# Altium PCB NB3000XN.PcbDoc (part 26 of 71)
Units mil, origin at the board's own origin, x right, y up, seen from the top; angles counter-clockwise.
Board outline 9527.56 x 6929.77 mil, 6 copper layers (Top Layer, GND+SHIELD, MidLayer1, MidLayer2, P2 - 3V3+5V0, Bottom Layer), stack 62.375 mil thick; 832 components, 1027 nets, 4655 pads, 4981 vias.
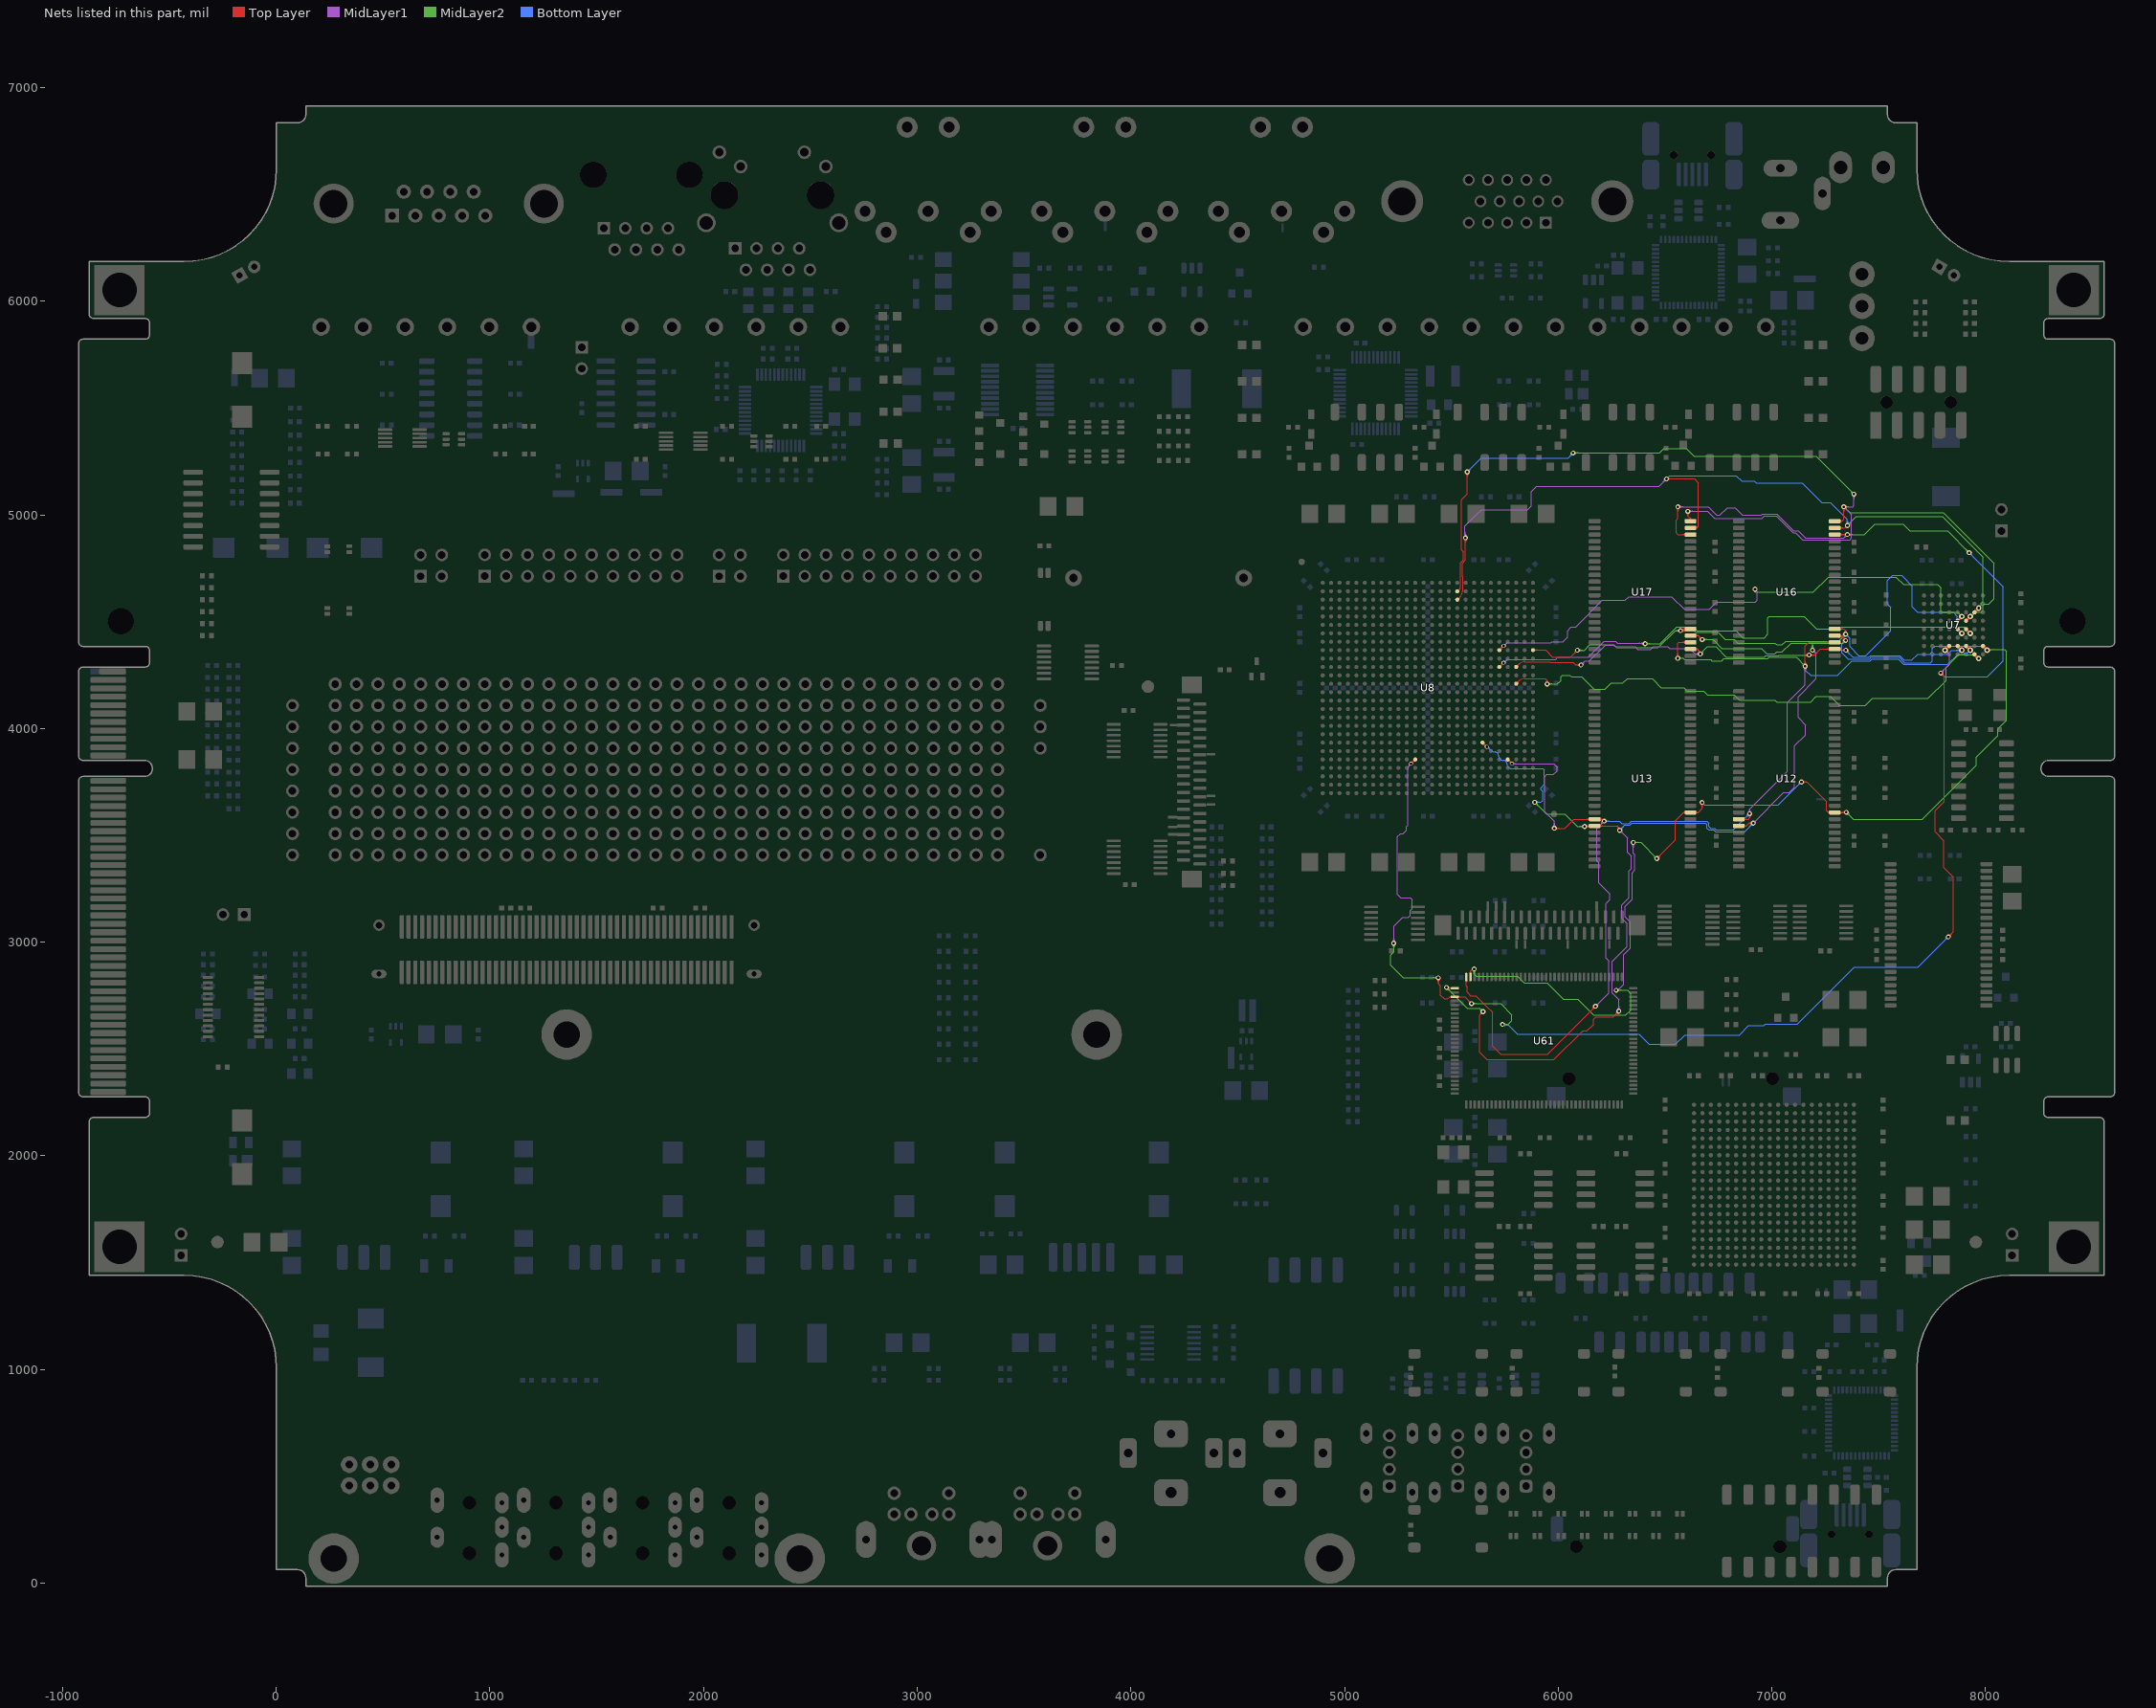
[diagram p30: the nets of this part, all layers, seen from the top]

## Via types
v1: diameter 23, hole 11.81, Top Layer to Bottom Layer, 3672 vias
v2: diameter 26, hole 11.81, Top Layer to Bottom Layer, 461 vias
v3: diameter 19, hole 11.81, Top Layer to Bottom Layer, tented both sides, 396 vias
v4: diameter 23.62, hole 11.81, Top Layer to Bottom Layer, 288 vias
v5: diameter 20, hole 11.81, Top Layer to Bottom Layer, 91 vias
v6: diameter 23, hole 11.81, Top Layer to Bottom Layer, tented both sides, 50 vias
v7: diameter 31, hole 11.81, Top Layer to Bottom Layer, 15 vias
v8: diameter 27.56, hole 11.81, Top Layer to Bottom Layer, tented both sides, 4 vias
v9: diameter 29, hole 11.81, Top Layer to Bottom Layer, 3 vias
v10: diameter 21, hole 11.81, Top Layer to Bottom Layer, 1 vias

## Nets (pads, with @x,y where several pads share a name; then routed paths per layer and width w, separated by ;. In a path a pad name is that pad's centre, name@x,y a point inside that pad or via, vN(x,y) a via of type N, cw(c..) or ccw(c..) an arc to the next point about the centre after c; other vN are vias at no path point) (continued)
DB_MEM.BUS_A14: U7.A7 U8.L24 U12.36 U13.36 U16.25 U17.25 U61.101 | length 8477.1
  Top Layer w4: U61.101@5586.86,2853.36 ccw(c5580.03,2860.19) 5589.69,2860.19 ccw(c5599.34,2860.19) U61.101@5592.51,2853.36 ; U61.101@5589.68,2837.34 5589.69,2866.2 5598.52,2875.04 v1(5606.86,2875.04) ; 5589.98,2866.5 cw(c5600.15,2856.33) v1@5605,2869.86 ; 5594.44,2870.96 cw(c5602.5,2862.9) v1@5606.35,2873.63 ; U8.L24@5803.39,4295.77 ccw(c5803.39,4313.49) 5815.92,4300.96 ; U8.L24@5810.73,4288.43 cw(c5828.45,4288.43) 5815.92,4300.96 ; 5924.74,4312.29 5920,4312.29 ; v1@6100.14,4290.99 ccw(c6083.92,4274.77) 6083.92,4297.71 ccw(c6083.92,4320.64) v1@6100.14,4304.43 ; v1@6102.97,4293.82 ccw(c6093.58,4284.43) 6093.58,4297.71 ccw(c6093.58,4310.99) v1@6102.97,4301.6 ; v1(6106.86,4297.71) 6081.16,4297.71 6070,4308.87 5965.11,4308.87 5961.69,4312.29 5920,4312.29 ; v1(6461.86,3391.71) 6548.52,3478.37 6548.52,3568.52 6587.52,3607.52 ; v1@6461.86,3397.21 ccw(c6461.86,3410.49) 6471.25,3401.1 ccw(c6480.64,3391.71) v1@6467.36,3391.71 ; v1@6461.86,3401.21 ccw(c6461.86,3424.14) 6478.07,3407.93 ccw(c6494.29,3391.71) v1@6471.36,3391.71 ; U13.36@6595.04,3603.32 ccw(c6587.52,3598.69) 6587.52,3607.52 ; U13.36@6595.04,3611.72 cw(c6587.52,3616.35) 6587.52,3607.52 ; U17.25@6619.41,4372.28 6650.95,4372.28 ; U13.36@6642.91,3602.16 cw(c6654.97,3591.27) 6654.97,3607.52 ; U13.36@6642.91,3612.88 ccw(c6654.97,3623.77) 6654.97,3607.52 ; U17.25@6643.87,4368.23 cw(c6650.95,4364.07) 6650.95,4372.28 ; U17.25@6643.87,4376.34 ccw(c6650.95,4380.5) 6650.95,4372.28 ; 6652.31,4370.92 cw(c6634,4352.61) v1@6659.73,4349.67 ; 6658.17,4365.06 cw(c6644.52,4351.41) v1@6663.7,4349.21 ; v1(6665.19,4349.04) 6665.19,4358.04 6650.95,4372.28 ; v1@6666.81,3647.66 cw(c6650.59,3631.44) 6673.52,3631.44 cw(c6696.46,3631.44) v1@6680.24,3647.66 ; v1@6669.64,3650.49 cw(c6660.25,3641.1) 6673.52,3641.1 cw(c6686.8,3641.1) v1@6677.41,3650.49 ; v1(6673.52,3654.37) 6673.52,3626.07 6654.97,3607.52 ; v1(7138.52,3750.04) 7165.19,3750.04 7256.86,3658.37 7256.86,3615.52 7264.86,3607.52 ; v1@7142.41,3746.15 cw(c7151.8,3736.76) 7151.8,3750.04 cw(c7151.8,3763.32) v1@7142.41,3753.93 ; v1@7145.24,3743.32 cw(c7161.46,3727.11) 7161.46,3750.04 cw(c7161.46,3772.98) v1@7145.24,3756.76 ; v1(7174.19,4344.37) 7200,4344.37 7227.91,4372.28 U16.25@7294.41,4372.28 U16.25@7298.52,4372.28 ; v1@7178.08,4340.49 cw(c7187.47,4331.1) 7187.47,4344.37 cw(c7187.47,4357.65) v1@7178.08,4348.26 ; v1@7180.91,4337.66 cw(c7197.13,4321.44) 7197.13,4344.37 cw(c7197.13,4367.31) v1@7180.91,4351.09 ; U12.36@7269.46,3604.45 ccw(c7264.86,3602.53) 7264.86,3607.52 ; U12.36@7269.46,3610.59 cw(c7264.86,3612.51) 7264.86,3607.52 ; U16.25@7271.19,4366.63 ccw(c7257.54,4352.97) 7257.54,4372.28 ccw(c7257.54,4391.6) U16.25@7271.19,4377.94 ; U16.25@7298.52,4366.71 U16.25@7298.52,4372.28 ; U12.36@7317.63,3601.86 cw(c7331.28,3588.21) 7331.28,3607.52 cw(c7331.28,3626.83) U12.36@7317.63,3613.18 ; U16.25@7319.2,4368.86 cw(c7324.61,4366.29) 7324.61,4372.28 ; U16.25@7319.2,4375.71 ccw(c7324.61,4378.28) 7324.61,4372.28 ; 7323.52,3607.52 ccw(c7323.52,3633.37) v1@7341.81,3615.09 ; 7327.65,3607.52 cw(c7327.65,3587.5) v1@7341.81,3601.66 ; 7333.18,3607.52 ccw(c7333.18,3623.72) v1@7344.64,3612.26 ; v1@7337.85,4362.16 ccw(c7330.19,4357.98) 7330.19,4366.71 ; v1@7337.85,4371.26 cw(c7330.19,4375.43) 7330.19,4366.71 ; v1(7346.19,4366.71) 7330.19,4366.71 ; v1(7348.52,3608.37) 7338.19,3608.37 7337.34,3607.52 U12.36@7294.41,3607.52 7264.86,3607.52 ; 5815.92,4300.96 cw(c5843.27,4273.61) 5843.27,4312.29 5910,4312.29 5920,4312.29 ; 6587.52,3607.52 6615,3607.52 6654.97,3607.52 ; U16.25@7298.52,4372.28 7324.62,4372.28 ; 7324.62,4372.28 7330.19,4366.71
  Top Layer w8: U7.A7@7987.8,4380.57 cw(c7987.8,4366.09) 7998.04,4376.33 cw(c8008.28,4386.57) U7.A7@7993.8,4386.57 ; U7.A7@7987.8,4386.57 v2(8007.48,4366.89) ; v2@7998.48,4366.89 ccw(c7976.75,4366.89) 7992.12,4382.25 ccw(c8007.48,4397.62) v2@8007.48,4375.89
  MidLayer1 w4: v1(6106.86,4297.71) 6125.86,4316.71 6146.15,4316.71 6220.48,4391.04 6260.19,4391.04 6268.19,4383.04 6359.86,4383.04 6372.52,4370.37 6431.86,4370.37 6444.86,4383.37 6512.82,4383.37 6521.15,4375.04 6615.19,4375.04 6641.19,4349.04 v1(6665.19,4349.04) ; v1@6106.86,4303.21 ccw(c6106.86,4316.49) 6116.25,4307.1 ccw(c6125.64,4297.71) v1@6112.36,4297.71 ; v1@6106.86,4307.21 ccw(c6106.86,4330.14) 6123.07,4313.93 ccw(c6139.29,4297.71) v1@6116.36,4297.71 ; v1(6271.52,2775.04) 6279.19,2775.04 6306.86,2802.71 6306.86,2942.06 6337.52,2972.73 6337.52,3094 6313.19,3118.34 6313.19,3168.41 6346.86,3202.08 6346.86,3325.04 6359.19,3337.37 6359.19,3409.02 6350.86,3417.35 v1(6350.86,3466.71) ; v1@6344.14,3459.99 cw(c6327.92,3443.77) 6350.86,3443.77 cw(c6373.79,3443.77) v1@6357.57,3459.99 ; v1@6346.97,3462.82 cw(c6337.58,3453.43) 6350.86,3453.43 cw(c6364.14,3453.43) v1@6354.75,3462.82 ; v1@6658.47,4342.32 ccw(c6642.26,4326.11) 6642.26,4349.04 ccw(c6642.26,4371.98) v1@6658.47,4355.76 ; v1@6661.3,4345.15 ccw(c6651.91,4335.76) 6651.91,4349.04 ccw(c6651.91,4362.32) v1@6661.3,4352.93
  MidLayer2 w4: v1@5600.14,2868.32 cw(c5583.92,2852.11) 5606.86,2852.11 cw(c5629.79,2852.11) v1@5613.57,2868.32 ; v1@5602.97,2871.15 cw(c5593.58,2861.76) 5606.86,2861.76 cw(c5620.14,2861.76) v1@5610.75,2871.15 ; v1(5606.86,2875.04) 5606.86,2851.69 5617.17,2841.37 5808.56,2841.37 5841.56,2808.37 5948.52,2808.37 6023.52,2733.37 6091.52,2733.37 6166.52,2658.37 6316.52,2658.37 6340.19,2682.04 6340.19,2758.37 6323.52,2775.04 v1(6271.52,2775.04) ; v1@6275.41,2771.15 cw(c6284.8,2761.76) 6284.8,2775.04 cw(c6284.8,2788.32) v1@6275.41,2778.93 ; v1@6278.24,2768.32 cw(c6294.46,2752.11) 6294.46,2775.04 cw(c6294.46,2797.98) v1@6278.24,2781.76 ; v1(6350.86,3466.71) 6386.86,3466.71 v1(6461.86,3391.71) ; v1@6354.75,3462.82 cw(c6364.14,3453.43) 6364.14,3466.71 cw(c6364.14,3479.99) v1@6354.75,3470.6 ; v1@6357.57,3459.99 cw(c6373.79,3443.77) 6373.79,3466.71 cw(c6373.79,3489.64) v1@6357.57,3473.43 ; v1@6452.36,3391.71 ccw(c6429.42,3391.71) 6445.64,3407.93 ccw(c6461.86,3424.14) v1@6461.86,3401.21 ; v1@6456.36,3391.71 ccw(c6443.08,3391.71) 6452.47,3401.1 ccw(c6461.86,3410.49) v1@6461.86,3397.21 ; v1(6665.19,4349.04) 6699.52,4383.37 6738.19,4383.37 6786.86,4334.71 6965.19,4334.71 6972.19,4341.71 7032.52,4341.71 7035.19,4344.37 v1(7174.19,4344.37) ; v1@6665.19,4354.54 ccw(c6665.19,4367.82) 6674.58,4358.43 ccw(c6683.97,4349.04) v1@6670.69,4349.04 ; v1@6665.19,4358.54 ccw(c6665.19,4381.48) 6681.41,4365.26 ccw(c6697.63,4349.04) v1@6674.69,4349.04 ; v1@7167.47,4337.66 ccw(c7151.26,4321.44) 7151.26,4344.37 ccw(c7151.26,4367.31) v1@7167.47,4351.09 ; v1@7170.3,4340.49 ccw(c7160.91,4331.1) 7160.91,4344.37 ccw(c7160.91,4357.65) v1@7170.3,4348.26 ; v1@7348.52,3598.87 cw(c7348.52,3575.94) 7364.74,3592.16 cw(c7380.96,3608.37) v1@7358.02,3608.37 ; v1@7348.52,3602.87 cw(c7348.52,3589.6) 7357.91,3598.99 cw(c7367.3,3608.37) v1@7354.02,3608.37 ; v1(7348.52,3608.37) 7373.52,3583.37 7382.52,3574.37 7703.21,3574.37 7712.21,3583.37 7956.86,3828.02 7956.86,3867.04 8056.86,3967.04 8056.86,3998.26 8098.52,4039.92 8098.52,4360.85 8090,4369.37 8009.97,4369.37 v2(8007.48,4366.89) ; v2@8009.6,4364.77 cw(c8020.72,4353.65) 8020.72,4369.37 ; v2@8012.43,4361.94 cw(c8030.38,4343.99) 8030.38,4369.37 ; v2@8015.26,4359.11 cw(c8040.04,4334.33) 8040.04,4369.37 ; v2@8015.26,4374.67 ccw(c8028.04,4387.45) 8028.04,4369.37
  Bottom Layer w4: v1(6673.52,3654.37) 6686.19,3641.71 7030.19,3641.71 v1(7138.52,3750.04) ; v1@7129.02,3750.04 cw(c7106.09,3750.04) 7122.31,3733.82 cw(c7138.52,3717.61) v1@7138.52,3740.54 ; v1@7133.02,3750.04 cw(c7119.75,3750.04) 7129.14,3740.65 cw(c7138.52,3731.26) v1@7138.52,3744.54 ; v1@7346.19,4357.21 cw(c7346.19,4334.27) 7362.41,4350.49 cw(c7378.63,4366.71) v1@7355.69,4366.71 ; v1@7346.19,4361.21 cw(c7346.19,4347.93) 7355.58,4357.32 cw(c7364.97,4366.71) v1@7351.69,4366.71 ; v1(7346.19,4366.71) 7379.52,4333.37 7453.9,4333.37 7462.23,4341.71 7598.47,4341.71 7619.8,4320.37 7655.52,4320.37 7682.86,4347.71 7740.86,4347.71 7751.52,4358.37 7751.52,4375.04 7763.52,4387.04 7987.33,4387.04 v2(8007.48,4366.89)
DB_MEM.BUS_A15: U7.C7 U8.AB23 U12.20 U13.20 U16.26 U17.26 U61.102 | length 7628.8
  Top Layer w4: U61.102@5567.17,2821.32 cw(c5560.34,2814.49) 5570,2814.49 cw(c5579.66,2814.49) U61.102@5572.83,2821.32 ; U61.102@5570,2837.34 5570,2795.23 5573.52,2791.71 5573.52,2766.71 5590.19,2750.04 5615.19,2750.04 5664.47,2700.76 5693,2672.23 5693,2513.31 5731.31,2475 5785,2475 5949.52,2475.04 v1(6174.52,2700.04) ; U8.AB23@5764.02,3847.85 cw(c5764.02,3829.75) 5776.82,3842.55 cw(c5789.62,3855.35) U8.AB23@5771.52,3855.35 ; U8.AB23@5764.02,3848.01 cw(c5764.02,3830.29) 5776.55,3842.82 cw(c5789.08,3855.35) U8.AB23@5771.36,3855.35 ; U8.AB23@5764.02,3855.35 v3(5783.7,3835.67) ; v1(5981.86,3533.37) 6030.33,3533.37 6072.98,3576.02 U13.20@6170.59,3576.02 ; v1@5985.75,3529.49 cw(c5995.14,3520.1) 5995.14,3533.37 cw(c5995.14,3546.65) v1@5985.75,3537.26 ; v1@5988.57,3526.66 cw(c6004.79,3510.44) 6004.79,3533.37 cw(c6004.79,3556.31) v1@5988.57,3540.09 ; U13.20@6147.37,3570.37 ccw(c6133.72,3556.71) 6133.72,3576.02 ccw(c6133.72,3595.34) U13.20@6147.37,3581.68 ; v1@6165.02,2700.04 cw(c6142.09,2700.04) 6158.31,2683.82 cw(c6174.52,2667.61) v1@6174.52,2690.54 ; v1@6169.02,2700.04 cw(c6155.75,2700.04) 6165.14,2690.65 cw(c6174.52,2681.26) v1@6174.52,2694.54 ; U13.20@6180.08,3576.04 cw(c6180.08,3532.57) v1@6211.25,3562.87 ; U13.20@6189.55,3576.04 cw(c6189.55,3541.77) v1@6214.11,3565.66 ; U13.20@6194.14,3581.32 ccw(c6205.86,3591.67) 6205.86,3576.04 ; U13.20@6194.16,3570.75 cw(c6205.86,3560.48) 6205.86,3576.04 ; 6199.02,3576.04 cw(c6199.02,3550.98) v1@6216.98,3568.45 ; v1@6208.38,3560.09 ccw(c6170.61,3523.36) 6170.61,3576.04 6205.86,3576.04 ; v1(6215.19,3566.71) 6205.86,3576.04 ; v1@6552.81,4335.76 ccw(c6536.59,4351.98) 6559.52,4351.98 ccw(c6582.46,4351.98) v1@6566.24,4335.76 ; v1@6555.64,4332.93 ccw(c6546.25,4342.32) 6559.52,4342.32 ccw(c6572.8,4342.32) v1@6563.41,4332.93 ; v1(6559.52,4329.04) 6559.52,4399.52 6563.78,4403.78 U17.26@6619.41,4403.78 ; U17.26@6596.19,4398.12 ccw(c6582.54,4384.47) 6582.54,4403.78 ccw(c6582.54,4423.09) U17.26@6596.19,4409.44 ; U12.20@6845.59,3576.02 6891.02,3576.02 6896.19,3581.19 ; U12.20@6868.81,3570.37 cw(c6882.46,3556.71) 6882.46,3576.02 cw(c6882.46,3595.34) U12.20@6868.81,3581.68 ; v1@6890.04,3594.46 cw(c6878.79,3581.19) 6896.19,3581.19 ; v1@6892.63,3597.51 cw(c6886.11,3589.83) 6896.19,3589.83 cw(c6906.27,3589.83) v1@6899.75,3597.51 ; v1(6896.19,3601.71) 6896.19,3581.19 ; v1@6902.34,3594.46 ccw(c6913.59,3581.19) 6896.19,3581.19 ; v1@7149.47,4298.43 ccw(c7133.26,4314.64) 7156.19,4314.64 ccw(c7179.13,4314.64) v1@7162.91,4298.43 ; v1@7152.3,4295.6 ccw(c7142.91,4304.99) 7156.19,4304.99 ccw(c7169.47,4304.99) v1@7160.08,4295.6 ; v1(7156.19,4291.71) 7156.19,4386.19 7173.78,4403.78 U16.26@7294.41,4403.78 ; U16.26@7271.19,4398.12 ccw(c7257.54,4384.47) 7257.54,4403.78 ccw(c7257.54,4423.09) U16.26@7271.19,4409.44 ; 5770.9,3848.47 cw(c5758.09,3835.67) 5776.2,3835.67 ccw(c5758.09,3835.67) 5770.9,3848.47 ; 5770.9,3848.47 ccw(c5783.7,3861.28) 5783.7,3843.17 cw(c5783.7,3861.28) 5770.9,3848.47
  Top Layer w8: U7.C7@7909.06,4380.57 cw(c7909.06,4366.09) 7919.3,4376.33 cw(c7929.54,4386.57) U7.C7@7915.06,4386.57 ; U7.C7@7909.06,4386.57 v2(7928.74,4366.89) ; v2@7919.74,4366.89 ccw(c7898.01,4366.89) 7913.38,4382.25 ccw(c7928.74,4397.62) v2@7928.74,4375.89
  MidLayer1 w4: v3(5783.7,3835.67) 5861.38,3835.67 5910,3835.67 5920,3835.67 5924.74,3835.67 5979.08,3835.67 5995,3819.74 5995,3802.12 5977.88,3785 5946.86,3785 5936.86,3775 5936.86,3611.71 5981.86,3566.71 v1(5981.86,3533.37) ; v3@5788.89,3830.48 cw(c5801.43,3817.94) 5801.43,3835.67 cw(c5801.43,3853.4) v3@5788.89,3840.86 ; v1@5975.14,3540.09 ccw(c5958.92,3556.31) 5981.86,3556.31 ccw(c6004.79,3556.31) v1@5988.57,3540.09 ; v1@5977.97,3537.26 ccw(c5968.58,3546.65) 5981.86,3546.65 ccw(c5995.14,3546.65) v1@5985.75,3537.26 ; v1(6174.52,2700.04) 6236.86,2762.37 6236.86,2913.04 6223.52,2926.37 6223.52,3180.71 6242.86,3200.04 6242.86,3225.04 6190.19,3277.71 6190.19,3372.06 6181.86,3380.39 6181.86,3533.37 v1(6215.19,3566.71) ; v1@6174.52,2705.54 ccw(c6174.52,2718.82) 6183.91,2709.43 ccw(c6193.3,2700.04) v1@6180.02,2700.04 ; v1@6174.52,2709.54 ccw(c6174.52,2732.48) 6190.74,2716.26 ccw(c6206.96,2700.04) v1@6184.02,2700.04 ; v1@6205.69,3566.71 cw(c6182.76,3566.71) 6198.97,3550.49 cw(c6215.19,3534.27) v1@6215.19,3557.21 ; v1@6209.69,3566.71 cw(c6196.41,3566.71) 6205.8,3557.32 cw(c6215.19,3547.93) v1@6215.19,3561.21 ; v1@6889.92,3608.84 ccw(c6877.73,3622.71) 6896.19,3622.71 ; v1@6892.56,3605.84 ccw(c6885.5,3613.87) 6896.19,3613.87 ccw(c6906.88,3613.87) v1@6899.82,3605.84 ; v1(6896.19,3601.71) 6896.19,3622.71 ; v1@6902.46,3608.84 cw(c6914.65,3622.71) 6896.19,3622.71 ; v1@7149.47,4284.99 cw(c7133.26,4268.77) 7156.19,4268.77 cw(c7179.13,4268.77) v1@7162.91,4284.99 ; v1@7152.3,4287.82 cw(c7142.91,4278.43) 7156.19,4278.43 cw(c7169.47,4278.43) v1@7160.08,4287.82 ; 7155,4245 7155,4203.54 7073.52,4122.06 7073.52,3800.04 6896.19,3622.71 ; 7156.19,4245 v1(7156.19,4291.71) ; 5801.81,3835.67 cw(c5801.81,3853.78) 5789,3840.97 ccw(c5801.81,3853.78) 5801.81,3835.67 ; 5801.81,3835.67 ccw(c5801.81,3817.56) 5789,3830.37 cw(c5801.81,3817.56) 5801.81,3835.67
  MidLayer2 w4: v1(6559.52,4329.04) 6584.33,4329.04 6590,4323.37 6713.52,4323.37 6719.52,4317.37 6765.19,4317.37 6774.52,4326.71 6981.86,4326.71 6988.52,4333.37 7114.52,4333.37 v1(7156.19,4291.71) ; v1@6563.41,4325.15 cw(c6572.8,4315.76) 6572.8,4329.04 cw(c6572.8,4342.32) v1@6563.41,4332.93 ; v1@6566.24,4322.32 cw(c6582.46,4306.11) 6582.46,4329.04 cw(c6582.46,4351.98) v1@6566.24,4335.76 ; v1@7146.69,4291.71 ccw(c7123.76,4291.71) 7139.97,4307.93 ccw(c7156.19,4324.14) v1@7156.19,4301.21 ; v1@7150.69,4291.71 ccw(c7137.41,4291.71) 7146.8,4301.1 ccw(c7156.19,4310.49) v1@7156.19,4297.21
  Bottom Layer w4: v1(6215.19,3566.71) 6287.52,3566.71 6298.52,3555.71 6331.86,3555.71 6342.86,3566.71 6696.86,3566.71 6705.19,3558.37 6705.19,3541.71 6713.52,3533.37 6731.48,3533.37 6739.82,3525.04 6819.52,3525.04 v1(6896.19,3601.71) ; v1@6219.08,3562.82 cw(c6228.47,3553.43) 6228.47,3566.71 cw(c6228.47,3579.99) v1@6219.08,3570.6 ; v1@6221.91,3559.99 cw(c6238.13,3543.77) 6238.13,3566.71 cw(c6238.13,3589.64) v1@6221.91,3573.43 ; v1@6886.69,3601.71 cw(c6863.76,3601.71) 6879.97,3585.49 cw(c6896.19,3569.27) v1@6896.19,3592.21 ; v1@6890.69,3601.71 cw(c6877.41,3601.71) 6886.8,3592.32 cw(c6896.19,3582.93) v1@6896.19,3596.21 ; v1@7151.35,4283.53 cw(c7146.32,4275.04) 7156.19,4275.04 ; v1(7156.19,4291.71) 7156.19,4275.04 ; v1@7161.03,4283.53 ccw(c7166.06,4275.04) 7156.19,4275.04 ; v2(7928.74,4366.89) 7915.88,4354.03 7903.85,4354.03 7897.52,4347.71 7871.19,4347.71 7823.52,4300.04 7617.51,4300.04 7592.55,4325 7575,4325 7468.19,4325.04 7459.86,4316.71 7375.19,4316.71 7308.52,4250.04 7181.19,4250.04 7156.19,4275.04
DB_MEM.BUS_A16: U7.D7 U8.Y20 U12.21 U13.21 U16.27 U17.27 U61.103 | length 8294.5
  Top Layer w4: v1@5477.92,2789.44 ccw(c5490.8,2802.31) 5490.8,2784.1 ; v1@5480.75,2792.26 ccw(c5500.45,2811.97) U61.103@5500.45,2784.1 ; v1@5481.13,2784.1 U61.103@5516.83,2784.1 ; v1@5483.57,2781.66 cw(c5489.47,2775.76) 5489.47,2784.1 ; v1@5483.57,2795.09 ccw(c5510.11,2821.63) U61.103@5510.11,2784.1 ; U61.103@5500.81,2781.27 ccw(c5493.98,2774.44) 5493.98,2784.1 ccw(c5493.98,2793.76) U61.103@5500.81,2786.93 ; v1@5639.02,2675.04 cw(c5616.09,2675.04) 5632.31,2658.82 cw(c5648.52,2642.61) v1@5648.52,2665.54 ; v1@5643.02,2675.04 cw(c5629.75,2675.04) 5639.13,2665.65 cw(c5648.52,2656.26) v1@5648.52,2669.54 ; U8.Y20@5645.91,3926.59 cw(c5645.91,3908.49) 5658.71,3921.29 cw(c5671.51,3934.09) U8.Y20@5653.41,3934.09 ; U8.Y20@5645.91,3926.75 cw(c5645.91,3909.03) 5658.44,3921.56 cw(c5670.97,3934.09) U8.Y20@5653.25,3934.09 ; U8.Y20@5645.91,3934.09 v3(5665.59,3914.41) ; v1(5648.52,2675.04) 5631.86,2658.37 5631.86,2485.37 5667.19,2450.04 5980.5,2450.04 6115.29,2584.82 6134.82,2584.82 6165.19,2615.19 6165.19,2638.73 6176.5,2650.04 6256.86,2650.04 v1(6283.86,2677.04) ; v1(6123.52,3541.71) 6170.59,3541.71 6173.52,3541.71 U13.21@6173.52,3544.53 ; v1@6126.91,3541.71 ccw(c6126.91,3570.65) U13.21@6147.37,3550.18 ; v1@6127.41,3537.82 cw(c6136.8,3528.43) 6136.8,3541.71 cw(c6136.8,3554.99) v1@6127.41,3545.6 ; v1@6130.24,3534.99 cw(c6146.46,3518.77) 6146.46,3541.71 cw(c6146.46,3564.64) v1@6130.24,3548.43 ; 6136.57,3541.71 ccw(c6136.57,3560.99) U13.21@6150.2,3547.36 ; 6140.53,3541.71 cw(c6140.53,3532.02) U13.21@6147.37,3538.87 ; U13.21@6170.59,3544.53 6179.53,3544.53 U13.21@6180,3545 ; U13.21@6180,3544.53 6275.71,3544.53 6287.86,3532.37 v1(6287.86,3524.04) ; U13.21@6193.81,3538.87 cw(c6207.46,3525.22) 6207.46,3544.53 cw(c6207.47,3563.84) U13.21@6193.81,3550.18 ; v1@6274.36,2677.04 cw(c6251.42,2677.04) 6267.64,2660.82 cw(c6283.86,2644.61) v1@6283.86,2667.54 ; 6276.86,3543.37 cw(c6262.46,3528.96) v1@6282.46,3525.09 ; v1@6278.36,2677.04 cw(c6265.08,2677.04) 6274.47,2667.65 cw(c6283.86,2658.26) v1@6283.86,2671.54 ; 6282.19,3538.05 cw(c6271.37,3527.23) v1@6286.38,3524.33 ; U17.27@6619.41,4435.28 6655.62,4435.28 ; U17.27@6642.76,4429.76 cw(c6655.62,4417.53) 6655.62,4435.28 ; U17.27@6642.76,4440.79 ccw(c6655.62,4453.02) 6655.62,4435.28 ; v1@6664.69,4416.71 ccw(c6641.76,4416.71) 6657.97,4432.93 ccw(c6674.19,4449.14) v1@6674.19,4426.21 ; v1@6668.69,4416.71 ccw(c6655.41,4416.71) 6664.8,4426.1 ccw(c6674.19,4435.49) v1@6674.19,4422.21 ; v1(6674.19,4416.71) 6655.62,4435.28 ; U12.21@6845.59,3544.53 6880,3544.53 ; U12.21@6869.35,3539.47 cw(c6880,3530.78) 6880,3544.53 ; U12.21@6869.35,3549.58 ccw(c6880,3558.27) 6880,3544.53 ; v1@6905.5,3551.37 ccw(c6892.85,3541.05) 6892.85,3557.37 ccw(c6892.85,3573.69) v1@6905.5,3563.38 ; v1@6908.6,3553.9 ccw(c6901.27,3547.93) 6901.27,3557.37 ccw(c6901.27,3566.82) v1@6908.6,3560.85 ; v1(6912.86,3557.37) 6892.85,3557.37 6880,3544.53 ; U16.27@7294.41,4435.28 7323.97,4435.28 ; U16.27@7311.97,4427.28 cw(c7311.97,4378.99) v1@7346.11,4413.13 ; U16.27@7311.97,4431.28 cw(c7311.97,4392.65) v1@7339.28,4419.96 ; U16.27@7311.97,4439.28 cw(c7311.97,4419.96) 7325.63,4433.62 ; U16.27@7314.71,4432.37 cw(c7320.79,4425.92) 7327.06,4432.19 ; U16.27@7317.46,4429.46 cw(c7323.62,4422.93) 7329.97,4429.28 ; U16.27@7319.35,4432.2 cw(c7323.97,4430.28) 7323.97,4435.28 ; U16.27@7319.35,4438.35 ccw(c7323.97,4440.27) 7323.97,4435.28 ; 7324.14,4435.1 ccw(c7317.97,4428.92) 7311.97,4435.28 cw(c7311.97,4406.31) 7332.45,4426.79 ; 7327.55,4431.69 cw(c7307.9,4412.04) v1@7335.69,4412.04 ; 7332.41,4426.84 ccw(c7345.19,4439.62) v1@7345.19,4421.54 ; 7334.38,4424.86 cw(c7321.55,4412.04) v1@7339.69,4412.04 ; v1(7345.19,4412.04) 7345.19,4414.05 7323.97,4435.28 ; 5652.79,3927.21 cw(c5639.98,3914.41) 5658.09,3914.41 ccw(c5639.98,3914.41) 5652.79,3927.21 ; 5652.79,3927.21 ccw(c5665.59,3940.02) 5665.59,3921.91 cw(c5665.59,3940.02) 5652.79,3927.21
  Top Layer w8: U7.D7@7869.69,4380.57 cw(c7869.69,4366.09) 7879.93,4376.33 cw(c7890.17,4386.57) U7.D7@7875.69,4386.57 ; U7.D7@7869.69,4386.57 v2(7889.37,4366.89) ; v2@7880.37,4366.89 ccw(c7858.64,4366.89) 7874.01,4382.25 ccw(c7889.37,4397.62) v2@7889.37,4375.89
  MidLayer1 w4: v1@6277.14,2683.76 ccw(c6260.92,2699.98) 6283.86,2699.98 ccw(c6306.79,2699.98) v1@6290.57,2683.76 ; v1@6279.97,2680.93 ccw(c6270.58,2690.32) 6283.86,2690.32 ccw(c6297.14,2690.32) v1@6287.75,2680.93 ; v1(6283.86,2677.04) 6283.86,2731.14 6252.86,2762.14 6252.86,2910.71 6321.52,2979.37 6321.52,3087.37 6297.19,3111.71 6297.19,3175.04 6330.86,3208.71 6330.86,3332.69 6343.19,3345.02 6343.19,3402.39 6323.86,3421.73 6323.86,3488.04 v1(6287.86,3524.04) ; v1@6287.86,3514.54 cw(c6287.86,3491.61) 6304.07,3507.82 cw(c6320.29,3524.04) v1@6297.36,3524.04 ; v1@6287.86,3518.54 cw(c6287.86,3505.26) 6297.25,3514.65 cw(c6306.64,3524.04) v1@6293.36,3524.04 ; v1(6912.86,3557.37) 7055.52,3700.04 7081.86,3700.04 7106.86,3725.04 7106.86,3919.34 7157.52,3970 7157.52,4017.48 7123.52,4051.48 7123.52,4149.43 7206.86,4232.77 7206.86,4350.04 v1(7190.19,4366.71) ; v1@6912.86,3562.87 ccw(c6912.86,3576.15) 6922.25,3566.76 ccw(c6931.64,3557.37) v1@6918.36,3557.37 ; v1@6912.86,3566.87 ccw(c6912.86,3589.81) 6929.07,3573.59 ccw(c6945.29,3557.37) v1@6922.36,3557.37 ; v1@7190.19,4357.21 cw(c7190.19,4334.27) 7206.41,4350.49 cw(c7222.63,4366.71) v1@7199.69,4366.71 ; v1@7190.19,4361.21 cw(c7190.19,4347.93) 7199.58,4357.32 cw(c7208.97,4366.71) v1@7195.69,4366.71
  MidLayer2 w4: v1@5476.86,2778.87 cw(c5476.86,2755.94) 5493.07,2772.16 cw(c5509.29,2788.37) v1@5486.36,2788.37 ; v1@5476.86,2782.87 cw(c5476.86,2769.6) 5486.25,2778.99 cw(c5495.64,2788.37) v1@5482.36,2788.37 ; v1(5476.86,2788.37) 5573.52,2691.71 5631.86,2691.71 v1(5648.52,2675.04) ; v1@5639.02,2675.04 ccw(c5616.09,2675.04) 5632.31,2691.26 ccw(c5648.52,2707.48) v1@5648.52,2684.54 ; v1@5643.02,2675.04 ccw(c5629.75,2675.04) 5639.14,2684.43 ccw(c5648.52,2693.82) v1@5648.52,2680.54 ; v1@5890.19,3645.54 cw(c5890.19,3622.61) 5906.41,3638.82 cw(c5922.63,3655.04) v1@5899.69,3655.04 ; v1@5890.19,3649.54 cw(c5890.19,3636.26) 5899.58,3645.65 cw(c5908.97,3655.04) v1@5895.69,3655.04 ; v1(5890.19,3655.04) 5945.19,3600.04 6031.86,3600.04 6090.19,3541.71 v1(6123.52,3541.71) ; v1@6116.81,3534.99 ccw(c6100.59,3518.77) 6100.59,3541.71 ccw(c6100.59,3564.64) v1@6116.81,3548.43 ; v1@6119.64,3537.82 ccw(c6110.25,3528.43) 6110.25,3541.71 ccw(c6110.25,3554.99) v1@6119.64,3545.6 ; v1(6674.19,4416.71) 6725.19,4416.71 6766.86,4375.04 6951.19,4375.04 6976.19,4350.04 7015.19,4350.04 7023.52,4358.37 7048.52,4358.37 7090.19,4400.04 7190.19,4400.04 ; v1@6678.08,4412.82 cw(c6687.47,4403.43) 6687.47,4416.71 cw(c6687.47,4429.99) v1@6678.08,4420.6 ; v1@6680.91,4409.99 cw(c6697.13,4393.77) 6697.13,4416.71 cw(c6697.13,4439.64) v1@6680.91,4423.43 ; v1@7183.47,4373.43 ccw(c7167.26,4389.64) 7190.19,4389.64 ccw(c7213.13,4389.64) v1@7196.91,4373.43 ; v1@7186.3,4370.6 ccw(c7176.91,4379.99) 7190.19,4379.99 ccw(c7203.47,4379.99) v1@7194.08,4370.6 ; v1(7190.19,4366.71) 7190.19,4400.04 ; v1(7345.19,4412.04) 7333.19,4400.04 7190.19,4400.04
  Bottom Layer w4: v3@5666.89,3907.02 cw(c5670.04,3889.19) 5680.42,3904.02 ; v3@5672.98,3915.71 ccw(c5690.81,3918.86) 5680.42,3904.02 ; v1(5890.19,3655.04) 5920.04,3655.04 5928.02,3663.02 5928.02,3704.42 5918.48,3713.97 5918.48,3721.15 5935,3737.67 5935,3805 5928.1,3811.9 5920,3811.9 5910,3811.9 5841.96,3811.9 5783.7,3811.9 cw(c5783.7,3835.67) 5759.93,3835.67 ccw(c5744.33,3835.67) 5744.33,3851.27 cw(c5744.33,3875.04) 5720.56,3875.04 ccw(c5704.96,3875.04) 5704.96,3890.64 cw(c5704.96,3914.41) 5688.15,3897.6 5680.42,3904.02 ; v1@5894.08,3651.15 cw(c5903.47,3641.76) 5903.47,3655.04 cw(c5903.47,3668.32) v1@5894.08,3658.93 ; v1@5896.91,3648.32 cw(c5913.13,3632.11) 5913.13,3655.04 cw(c5913.13,3677.98) v1@5896.91,3661.76 ; v1(6287.86,3524.04) 6311.52,3547.71 6335.17,3547.71 6345.84,3558.37 6690.52,3558.37 6697.19,3551.71 6697.19,3533.37 6705.52,3525.04 6728.51,3525.04 6736.84,3516.71 6872.19,3516.71 v1(6912.86,3557.37) ; v1@6287.86,3529.54 ccw(c6287.86,3542.82) 6297.25,3533.43 ccw(c6306.64,3524.04) v1@6293.36,3524.04 ; v1@6287.86,3533.54 ccw(c6287.86,3556.48) 6304.07,3540.26 ccw(c6320.29,3524.04) v1@6297.36,3524.04 ; v1@6903.36,3557.37 cw(c6880.42,3557.37) 6896.64,3541.16 cw(c6912.86,3524.94) v1@6912.86,3547.87 ; v1@6907.36,3557.37 cw(c6894.08,3557.37) 6903.47,3547.99 cw(c6912.86,3538.6) v1@6912.86,3551.87 ; v1@7335.69,4412.04 cw(c7312.76,4412.04) 7328.97,4395.82 cw(c7345.19,4379.61) v1@7345.19,4402.54 ; v1@7339.69,4412.04 cw(c7326.41,4412.04) 7335.8,4402.65 cw(c7345.19,4393.26) v1@7345.19,4406.54 ; v1(7345.19,4412.04) 7328.19,4395.04 7328.19,4354.71 7357.86,4325.04 7420,4325.04 7456.84,4325 7465.21,4333.37 7595.48,4333.37 7620.48,4308.37 7743.19,4308.37 7752.19,4317.37 7752.19,4345.04 7754.86,4347.71 7821.01,4347.71 7840.19,4366.89 v2(7889.37,4366.89) ; v2@7881.59,4359.11 ccw(c7862.81,4340.33) 7862.81,4366.89 ccw(c7862.81,4393.45) v2@7881.59,4374.67 ; v2@7884.42,4361.94 ccw(c7872.47,4349.99) 7872.47,4366.89 ccw(c7872.47,4383.79) v2@7884.42,4371.84
DB_MEM.BUS_A17: U7.E7 U8.AB12 U16.42 U17.42 U61.105 | length 9892.8
  Top Layer w4: v3(5311.26,3835.67) U8.AB12@5330.94,3855.35 ; U8.AB12@5323.44,3855.35 cw(c5305.34,3855.35) 5318.14,3842.55 cw(c5330.94,3829.75) U8.AB12@5330.94,3847.85 ; U8.AB12@5323.6,3855.35 cw(c5305.88,3855.35) 5318.41,3842.82 cw(c5330.94,3830.29) U8.AB12@5330.94,3848.01 ; v1@5432.47,2826.66 cw(c5416.26,2810.44) 5439.19,2810.44 cw(c5462.13,2810.44) v1@5445.91,2826.66 ; v1@5435.3,2829.49 cw(c5425.91,2820.1) 5439.19,2820.1 cw(c5452.47,2820.1) v1@5443.08,2829.49 ; v1(5439.19,2833.37) 5439.19,2805.81 5450,2795 5450,2751.82 5466.61,2735.21 5483.69,2735.21 5493.21,2744.73 U61.105@5516.83,2744.73 5562.17,2744.73 v1(5594.52,2712.37) ; U61.105@5500.81,2741.9 ccw(c5493.98,2735.07) 5493.98,2744.73 ccw(c5493.98,2754.39) U61.105@5500.81,2747.56 ; U61.105@5532.85,2741.9 cw(c5539.68,2735.07) 5539.68,2744.73 cw(c5539.68,2754.39) U61.105@5532.85,2747.56 ; v1@5585.02,2712.37 ccw(c5562.09,2712.37) 5578.31,2728.59 ccw(c5594.52,2744.81) v1@5594.52,2721.87 ; v1@5589.02,2712.37 ccw(c5575.75,2712.37) 5585.14,2721.76 ccw(c5594.52,2731.15) v1@5594.52,2717.87 ; v1@6553.81,5031.32 cw(c6537.59,5015.11) 6560.52,5015.11 cw(c6583.46,5015.11) v1@6567.24,5031.32 ; v1@6556.64,5034.15 cw(c6547.25,5024.76) 6560.52,5024.76 cw(c6573.8,5024.76) v1@6564.41,5034.15 ; v1(6560.52,5038.04) 6560.52,4983.33 6552.19,4975 6552.19,4915.72 6560.19,4907.72 U17.42@6619.41,4907.72 ; U17.42@6596.19,4902.06 ccw(c6582.54,4888.4) 6582.54,4907.72 ccw(c6582.54,4927.03) U17.42@6596.19,4913.37 ; U16.42@7294.41,4907.72 v1@7345.53,4907.72 ; U16.42@7317.63,4902.06 cw(c7331.28,4888.4) 7331.28,4907.72 cw(c7331.28,4927.03) U16.42@7317.63,4913.37 ; 7329.81,4907.72 ccw(c7329.81,4931.76) v1@7346.81,4914.76 ; 7331.37,4907.72 cw(c7331.37,4885.89) v1@7346.81,4901.32 ; 7339.47,4907.72 ccw(c7339.47,4922.1) v1@7349.64,4911.93 ; 7341.03,4907.72 cw(c7341.03,4895.54) v1@7349.64,4904.15 ; v1@7345.86,4908.04 v1(7353.52,4908.04) ; v1@7790.19,4250.54 cw(c7790.19,4227.61) 7806.41,4243.82 cw(c7822.63,4260.04) v1@7799.69,4260.04 ; v1@7790.19,4254.54 cw(c7790.19,4241.26) 7799.58,4250.65 cw(c7808.97,4260.04) v1@7795.69,4260.04 ; v1(7790.19,4260.04) 7807.19,4243.04 7807.19,3658.71 7798.52,3650.04 7763.45,3614.97 7763.45,3516.55 7805,3475 7805,3348.38 7849.19,3304.19 7849.19,3048.37 v1(7825.86,3025.04) ; v1@7825.86,3030.54 ccw(c7825.86,3043.82) 7835.25,3034.43 ccw(c7844.64,3025.04) v1@7831.36,3025.04 ; v1@7825.86,3034.54 ccw(c7825.86,3057.48) 7842.07,3041.26 ccw(c7858.29,3025.04) v1@7835.36,3025.04 ; 5324.06,3848.47 cw(c5311.26,3861.28) 5311.26,3843.17 ccw(c5311.26,3861.28) 5324.06,3848.47 ; 5324.06,3848.47 ccw(c5336.87,3835.67) 5318.76,3835.67 cw(c5336.87,3835.67) 5324.06,3848.47
  Top Layer w8: v2(7810.63,4366.89) U7.E7@7830.32,4386.57 ; v2@7810.63,4375.89 ccw(c7810.63,4397.62) 7825.99,4382.25 ccw(c7841.36,4366.89) v2@7819.63,4366.89 ; U7.E7@7824.32,4386.57 cw(c7809.83,4386.57) 7820.07,4376.33 cw(c7830.32,4366.09) U7.E7@7830.32,4380.57
  MidLayer1 w4: v1@5223.28,3001.72 ccw(c5202.58,3022.42) 5231.86,3022.42 ; v1@5226.11,2998.89 ccw(c5212.24,3012.76) 5231.86,3012.76 ; v1(5230,2995) 5230,2993.56 5231.86,2991.71 5231.86,3076.86 5271.71,3116.71 5298.52,3116.71 5306.86,3125.04 5306.86,3147.02 5317.19,3157.35 5317.19,3200.04 5308.86,3208.37 5262.19,3208.37 5247.86,3222.71 5247.86,3494.04 5262.19,3508.37 5274.33,3508.37 5289.86,3523.9 5290.19,3523.9 5290.19,3541.71 5295.75,3547.27 5295.75,3660 5295.75,3670 5295.75,3718.62 5295.75,3812.16 ; 5231.86,3013.45 ccw(c5248.45,3013.45) v1@5236.72,3001.72 ; 5295.75,3798.23 5295.75,3812.16 ; 5299.87,3822.09 ccw(c5309.8,3812.16) 5295.75,3812.16 ; v3@5303.79,3835.02 cw(c5285.75,3833.44) 5299.62,3821.8 cw(c5313.49,3810.16) v3@5311.91,3828.2 ; v1(6560.52,5038.04) 6702.19,5038.04 6740.19,5000.04 6757.86,5000.04 6791.52,5033.71 6828.54,5033.71 6862.54,4999.71 6951.86,4999.71 6955.86,5003.71 7023.52,5003.71 7102.19,4925.04 7123.86,4925.04 7157.19,4891.71 7337.19,4891.71 v1(7353.52,4908.04) ; v1@6564.41,5034.15 cw(c6573.8,5024.76) 6573.8,5038.04 cw(c6573.8,5051.32) v1@6564.41,5041.93 ; v1@6567.24,5031.32 cw(c6583.46,5015.11) 6583.46,5038.04 cw(c6583.46,5060.98) v1@6567.24,5044.76 ; v1@7344.02,4908.04 cw(c7321.09,4908.04) 7337.31,4891.82 cw(c7353.52,4875.61) v1@7353.52,4898.54 ; v1@7348.02,4908.04 cw(c7334.75,4908.04) 7344.13,4898.65 cw(c7353.52,4889.26) v1@7353.52,4902.54 ; v1(7790.19,4260.04) 7831.86,4301.71 7831.86,4345.66 v2(7810.63,4366.89) ; v1@7790.19,4265.54 ccw(c7790.19,4278.82) 7799.58,4269.43 ccw(c7808.97,4260.04) v1@7795.69,4260.04 ; v1@7790.19,4269.54 ccw(c7790.19,4292.48) 7806.41,4276.26 ccw(c7822.63,4260.04) v1@7799.69,4260.04 ; v2@7810.63,4355.89 cw(c7810.63,4329.33) 7829.41,4348.11 cw(c7848.19,4366.89) v2@7821.63,4366.89 ; v2@7810.63,4359.89 cw(c7810.63,4342.99) 7822.58,4354.94 cw(c7834.53,4366.89) v2@7817.63,4366.89
  MidLayer2 w4: v1@5223.28,2988.28 cw(c5202.58,2967.58) 5231.86,2967.58 ; v1@5226.11,2991.11 cw(c5212.24,2977.24) 5231.86,2977.24 ; v1(5230,2995) 5231.86,2993.14 5231.86,2956.67 5215.19,2940 5215.19,2891.71 5273.52,2833.37 v1(5439.19,2833.37) ; 5231.86,2976.55 cw(c5248.45,2976.55) v1@5236.72,2988.28 ; v1@5432.47,2826.66 ccw(c5416.26,2810.44) 5416.26,2833.37 ccw(c5416.26,2856.31) v1@5432.47,2840.09 ; v1@5435.3,2829.49 ccw(c5425.91,2820.1) 5425.91,2833.37 ccw(c5425.91,2846.65) v1@5435.3,2837.26 ; v1(5594.52,2712.37) 5730.23,2712.37 5782.52,2660.08 5782.52,2632.52 5765.37,2615.37 v1(5739.52,2615.37) ; v1@5598.41,2708.49 cw(c5607.8,2699.1) 5607.8,2712.37 cw(c5607.8,2725.65) v1@5598.41,2716.26 ; v1@5601.24,2705.66 cw(c5617.46,2689.44) 5617.46,2712.37 cw(c5617.46,2735.31) v1@5601.24,2719.09 ; v1@5743.41,2611.49 cw(c5752.8,2602.1) 5752.8,2615.37 cw(c5752.8,2628.65) v1@5743.41,2619.26 ; v1@5746.24,2608.66 cw(c5762.46,2592.44) 5762.46,2615.37 cw(c5762.46,2638.31) v1@5746.24,2622.09 ; v1(7353.52,4908.04) 7433.04,4908.04 7482,4957 7613.58,4957 7645.54,4925.04 7821.86,4925.04 v1(7923.52,4823.37) ; v1@7357.41,4904.15 cw(c7366.8,4894.76) 7366.8,4908.04 cw(c7366.8,4921.32) v1@7357.41,4911.93 ; v1@7360.24,4901.32 cw(c7376.46,4885.11) 7376.46,4908.04 cw(c7376.46,4930.98) v1@7360.24,4914.76 ; v1@7914.02,4823.37 ccw(c7891.09,4823.37) 7907.31,4839.59 ccw(c7923.52,4855.81) v1@7923.52,4832.87 ; v1@7918.02,4823.37 ccw(c7904.75,4823.37) 7914.14,4832.76 ccw(c7923.52,4842.15) v1@7923.52,4828.87
  Bottom Layer w4: v1(5739.52,2615.37) 5764.52,2615.37 5810.52,2569.37 6379.19,2569.37 6425.52,2523.04 6548.9,2523.04 6592.23,2566.37 6848.19,2566.37 6892.19,2610.37 6963.56,2610.37 6969.9,2616.71 7119.52,2616.71 7386.19,2883.37 7684.19,2883.37 v1(7825.86,3025.04) ; v1@5743.41,2611.49 cw(c5752.8,2602.1) 5752.8,2615.37 cw(c5752.8,2628.65) v1@5743.41,2619.26 ; v1@5746.24,2608.66 cw(c5762.46,2592.44) 5762.46,2615.37 cw(c5762.46,2638.31) v1@5746.24,2622.09 ; v1@7790.19,4250.54 cw(c7790.19,4227.61) 7806.41,4243.82 cw(c7822.63,4260.04) v1@7799.69,4260.04 ; v1@7790.19,4254.54 cw(c7790.19,4241.26) 7799.58,4250.65 cw(c7808.97,4260.04) v1@7795.69,4260.04 ; v1(7790.19,4260.04) 7808.52,4241.71 8007.86,4241.71 8083.52,4317.37 8083.52,4663.37 v1(7923.52,4823.37) ; v1@7816.36,3025.04 cw(c7793.42,3025.04) 7809.64,3008.82 cw(c7825.86,2992.61) v1@7825.86,3015.54 ; v1@7820.36,3025.04 cw(c7807.08,3025.04) 7816.47,3015.65 cw(c7825.86,3006.26) v1@7825.86,3019.54 ; v1@7923.52,4813.87 cw(c7923.52,4790.94) 7939.74,4807.16 cw(c7955.96,4823.37) v1@7933.02,4823.37 ; v1@7923.52,4817.87 cw(c7923.52,4804.6) 7932.91,4813.99 cw(c7942.3,4823.37) v1@7929.02,4823.37
DB_MEM.BUS_A18: U7.B3 U8.C17 U16.43 U17.43 | length 4420.5
  Top Layer w4: v1@5559.47,4885.99 cw(c5543.26,4869.77) 5566.19,4869.77 cw(c5589.13,4869.77) v1@5572.91,4885.99 ; v1@5562.3,4888.82 cw(c5552.91,4879.43) 5566.19,4879.43 cw(c5579.47,4879.43) v1@5570.08,4888.82 ; v1(5566.19,4892.71) 5566.19,4787.98 5551.66,4773.45 5551.66,4724.74 5551.66,4720 5551.66,4710 5551.66,4643.27 ; v1(6506.86,5168.71) 6638.71,5168.71 6656.86,5150.56 6656.86,4947.21 ; v1@6510.75,5164.82 cw(c6520.14,5155.43) 6520.14,5168.71 cw(c6520.14,5181.99) v1@6510.75,5172.6 ; v1@6513.57,5161.99 cw(c6529.79,5145.77) 6529.79,5168.71 cw(c6529.79,5191.64) v1@6513.57,5175.43 ; U17.43@6619.41,4939.21 6648.86,4939.21 ; U17.43@6636.97,4939.21 ccw(c6642.79,4947.68) 6650.06,4940.41 ; U17.43@6639.24,4942.51 ccw(c6645.56,4951.71) 6653.46,4943.81 ; U17.43@6641.5,4945.8 ccw(c6648.33,4955.74) 6656.86,4947.21 ; U17.43@6644.38,4936.2 cw(c6648.86,4934.38) 6648.86,4939.21 ; U17.43@6644.38,4942.23 ccw(c6648.86,4944.05) 6648.86,4939.21 ; U16.43@7294.41,4939.21 7342.7,4939.21 v1(7353.52,4950.04) ; U16.43@7317.63,4933.56 cw(c7331.28,4919.9) 7331.28,4939.21 cw(c7331.28,4958.53) U16.43@7317.63,4944.87 ; 5540.33,4615.92 ccw(c5512.98,4643.27) 5551.66,4643.27 ; 5540.33,4615.92 ccw(c5512.98,4643.27) 5551.66,4643.27 ; 5540.33,4615.92 ccw(c5552.86,4603.39) 5535.14,4603.39 cw(c5552.86,4603.39) 5540.33,4615.92 ; 5540.33,4615.92 cw(c5527.8,4628.45) 5527.8,4610.73 ccw(c5527.8,4628.45) 5540.33,4615.92 ; 6648.86,4939.21 6656.86,4947.21
  Top Layer w8: U7.B3@7948.43,4544.06 v2(7968.11,4563.74) ; U7.B3@7948.43,4550.06 ccw(c7948.43,4564.54) 7958.67,4554.3 ccw(c7968.91,4544.06) U7.B3@7954.43,4544.06 ; v2@7959.11,4563.74 cw(c7937.38,4563.74) 7952.75,4548.38 cw(c7968.11,4533.01) v2@7968.11,4554.74
  MidLayer1 w4: v1@5559.47,4899.43 ccw(c5548.89,4910.01) 5563.86,4910.01 ; 5563.86,4911.62 ccw(c5585.1,4911.62) v1@5570.08,4896.6 ; 5563.86,4921.28 ccw(c5594.76,4921.28) v1@5572.91,4899.43 ; v1(5566.19,4892.71) 5563.86,4895.04 5563.86,4948.1 5616.64,5000.88 5640.8,5025.04 5856.86,5025.04 5873.52,5041.71 5873.52,5108.37 5898.52,5133.37 6471.52,5133.37 v1(6506.86,5168.71) ; v1@6497.36,5168.71 cw(c6474.42,5168.71) 6490.64,5152.49 cw(c6506.86,5136.27) v1@6506.86,5159.21 ; v1@6501.36,5168.71 cw(c6488.08,5168.71) 6497.47,5159.32 cw(c6506.86,5149.93) v1@6506.86,5163.21
  MidLayer2 w4: v1(7353.52,4950.04) 7395.19,4991.71 7798.52,4991.71 7965.19,4825.04 7988,4802.23 7988,4595 7980,4587 7980,4575.63 v2(7968.11,4563.74) ; v1@7353.52,4955.54 ccw(c7353.52,4968.82) 7362.91,4959.43 ccw(c7372.3,4950.04) v1@7359.02,4950.04 ; v1@7353.52,4959.54 ccw(c7353.52,4982.48) 7369.74,4966.26 ccw(c7385.96,4950.04) v1@7363.02,4950.04
  Bottom Layer w4: v1(6506.86,5168.71) 6522.19,5184.04 6833.21,5184.04 6858.88,5158.37 6918.17,5158.37 6926.5,5150.04 7050,5150.04 7067.19,5150.04 7142.56,5150.04 7234.23,5058.37 7270,5058.37 7273.52,5058.37 7353.52,4978.37 v1(7353.52,4950.04) ; v1@7346.81,4956.76 ccw(c7330.59,4972.98) 7353.52,4972.98 ccw(c7376.46,4972.98) v1@7360.24,4956.76 ; v1@7349.64,4953.93 ccw(c7340.25,4963.32) 7353.52,4963.32 ccw(c7366.8,4963.32) v1@7357.41,4953.93
DB_MEM.BUS_A19: U7.C4 U8.B17 U16.44 U17.44 | length 5840.3
  Top Layer w4: 5543.3,4725.04 5543.3,4724.74 ; v1@5567.81,5194.32 cw(c5551.59,5178.11) 5574.52,5178.11 cw(c5597.46,5178.11) v1@5581.24,5194.32 ; v1@5570.64,5197.15 cw(c5561.25,5187.76) 5574.52,5187.76 cw(c5587.8,5187.76) v1@5578.41,5197.15 ; v1(5574.52,5201.04) 5574.52,5097.67 5548.52,5071.67 5548.52,4836.35 5556.86,4828.02 5556.86,4789.96 5543.3,4776.41 5543.3,4724.74 ; v1@6600.59,5009.57 cw(c6588.4,4995.71) 6606.86,4995.71 ; v1@6603.23,5012.58 cw(c6596.17,5004.55) 6606.86,5004.55 cw(c6617.54,5004.55) v1@6610.49,5012.58 ; v1(6606.86,5016.71) 6606.86,4995.71 ; v1@6613.13,5009.57 ccw(c6625.32,4995.71) 6606.86,4995.71 ; U17.44@6616.09,4977.99 ccw(c6613.73,4983.16) 6619.41,4983.16 ; U17.44@6619.41,4970.71 6619.41,4983.16 ; U17.44@6622.73,4977.99 cw(c6625.09,4983.16) 6619.41,4983.16 ; U16.44@7294.41,4970.71 7328.86,4970.71 ; U16.44@7318.16,4965.64 cw(c7328.86,4956.88) 7328.86,4970.71 ; U16.44@7318.16,4975.78 ccw(c7328.86,4984.53) 7328.86,4970.71 ; v1@7330.14,5031.66 cw(c7313.92,5015.44) 7336.86,5015.44 cw(c7359.79,5015.44) v1@7343.57,5031.66 ; v1@7332.97,5034.49 cw(c7323.58,5025.1) 7336.86,5025.1 cw(c7350.14,5025.1) v1@7340.75,5034.49 ; v1(7336.86,5038.37) 7336.86,4978.71 7328.86,4970.71 ; 5540.33,4655.29 ccw(c5533.15,4662.47) 5543.3,4662.47 ; 5540.33,4655.29 ccw(c5533.15,4662.47) 5543.3,4662.47 ; 5540.33,4655.29 cw(c5527.8,4667.83) 5527.8,4650.1 ccw(c5527.8,4667.83) 5540.33,4655.29 ; 5540.33,4655.29 ccw(c5552.86,4642.76) 5535.14,4642.76 cw(c5552.86,4642.76) 5540.33,4655.29 ; 5543.3,4662.47 5543.3,4710 5543.3,4720 5543.3,4724.74 ; 6606.86,4995.71 6619.41,4983.16
  Top Layer w8: U7.C4@7909.06,4504.69 v2(7928.74,4524.37) ; U7.C4@7909.06,4510.69 ccw(c7909.06,4525.17) 7919.3,4514.93 ccw(c7929.54,4504.69) U7.C4@7915.06,4504.69 ; v2@7919.74,4524.37 cw(c7898.01,4524.37) 7913.38,4509.01 cw(c7928.74,4493.64) v2@7928.74,4515.37
  MidLayer1 w4: v1(6606.86,5016.71) 6698.52,5016.71 6731.86,4983.37 6952.86,4983.37 6965.19,4995.71 7020.21,4995.71 7099.21,4916.71 7110.19,4916.71 7143.52,4883.37 7365.19,4883.37 7373.52,4891.71 7373.52,5001.71 v1(7336.86,5038.37) 7378.37,5038.37 7384.52,5044.52 v1(7384.52,5097.37) ; v1@6610.75,5012.82 cw(c6620.14,5003.43) 6620.14,5016.71 cw(c6620.14,5029.99) v1@6610.75,5020.6 ; v1@6613.57,5009.99 cw(c6629.79,4993.77) 6629.79,5016.71 cw(c6629.79,5039.64) v1@6613.57,5023.43 ; v1@7336.86,5028.87 cw(c7336.86,5005.94) 7353.07,5022.16 cw(c7369.29,5038.37) v1@7346.36,5038.37 ; v1@7336.86,5032.87 cw(c7336.86,5019.6) 7346.25,5028.99 cw(c7355.64,5038.37) v1@7342.36,5038.37 ; v1@7340.75,5034.49 cw(c7350.14,5025.1) 7350.14,5038.37 cw(c7350.14,5051.65) v1@7340.75,5042.26 ; v1@7343.57,5031.66 cw(c7359.79,5015.44) 7359.79,5038.37 cw(c7359.79,5061.31) v1@7343.57,5045.09 ; v1@7377.81,5090.66 cw(c7361.59,5074.44) 7384.52,5074.44 cw(c7407.46,5074.44) v1@7391.24,5090.66 ; v1@7380.64,5093.49 cw(c7371.25,5084.1) 7384.52,5084.1 cw(c7397.8,5084.1) v1@7388.41,5093.49
  MidLayer2 w4: v1(6070,5290) 6475,5290 6495,5310 6600,5310 6635,5275 7206.9,5275 v1(7384.52,5097.37) v1@7384.52,5101.37 ; v1@6073.89,5286.11 cw(c6083.28,5276.72) 6083.28,5290 cw(c6083.28,5303.28) v1@6073.89,5293.89 ; v1@6076.72,5283.28 cw(c6092.93,5267.06) 6092.93,5290 cw(c6092.93,5312.93) v1@6076.72,5296.72 ; v1@7336.86,5028.87 cw(c7336.86,5005.94) 7353.07,5022.16 cw(c7369.29,5038.37) v1@7346.36,5038.37 ; v1@7336.86,5032.87 cw(c7336.86,5019.6) 7346.25,5028.99 cw(c7355.64,5038.37) v1@7342.36,5038.37 ; v1(7336.86,5038.37) 7365.23,5010 7802.86,5010 8040,4772.86 8040,4608.56 8040.19,4608.37 8015.19,4583.37 7993.37,4583.37 7988,4578 7988,4551 7981,4544 7948.37,4544 ; v1@7375.02,5097.37 ccw(c7352.09,5097.37) 7368.31,5113.59 ccw(c7384.52,5129.81) v1@7384.52,5106.87 ; v1@7379.02,5097.37 ccw(c7365.75,5097.37) 7375.14,5106.76 ccw(c7384.52,5116.15) v1@7384.52,5102.87 ; v2(7928.74,4524.37) 7948.37,4544 ; v2@7928.74,4531.37 ccw(c7928.74,4548.27) 7940.69,4536.32 ccw(c7952.64,4524.37) v2@7935.74,4524.37 ; v2@7928.74,4535.37 ccw(c7928.74,4561.93) 7947.52,4543.15 ccw(c7966.3,4524.37) v2@7939.74,4524.37 ; 7948.52,4544.15 7948.37,4544
  Bottom Layer w4: v1(5574.52,5201.04) 5639.86,5266.37 6046.37,5266.37 v1(6070,5290) ; v1@5574.52,5206.54 ccw(c5574.52,5219.82) 5583.91,5210.43 ccw(c5593.3,5201.04) v1@5580.02,5201.04 ; v1@5574.52,5210.54 ccw(c5574.52,5233.48) 5590.74,5217.26 ccw(c5606.96,5201.04) v1@5584.02,5201.04 ; v1@6060.5,5290 cw(c6037.56,5290) 6053.78,5273.78 cw(c6070,5257.56) v1@6070,5280.5 ; v1@6064.5,5290 cw(c6051.22,5290) 6060.61,5280.61 cw(c6070,5271.22) v1@6070,5284.5
DB_MEM.BUS_A20: U7.D5 U8.J26 U16.28 U17.28 | length 3585.2
  Top Layer w4: U8.J26@5882.13,4367.17 5910,4367.17 5920,4367.17 5924.74,4367.17 5940.75,4367.16 5973.54,4334.37 6057.86,4334.37 v1(6090.19,4366.71) ; U8.J26@5887.32,4361.97 cw(c5899.85,4349.44) 5899.85,4367.17 cw(c5899.85,4384.89) U8.J26@5887.32,4372.36 ; U8.J26@5887.43,4361.86 cw(c5900.23,4349.06) 5900.23,4367.17 cw(c5900.23,4385.27) U8.J26@5887.43,4372.47 ; v1@6080.69,4366.71 cw(c6057.76,4366.71) 6073.97,4350.49 cw(c6090.19,4334.27) v1@6090.19,4357.21 ; v1@6084.69,4366.71 cw(c6071.41,4366.71) 6080.8,4357.32 cw(c6090.19,4347.93) v1@6090.19,4361.21 ; v1@6571.09,4460.14 cw(c6587.09,4444.14) 6587.09,4466.77 ; v1(6572.86,4458.37) 6581.25,4466.77 U17.28@6619.41,4466.77 ; v1@6573.92,4457.31 cw(c6596.75,4434.48) U17.28@6596.75,4466.77 ; v1@6576.75,4454.49 cw(c6606.41,4424.82) U17.28@6606.41,4466.77 ; v1@6579.57,4451.66 cw(c6616.06,4415.17) U17.28@6616.06,4466.77 ; U17.28@6596.19,4461.12 ccw(c6582.54,4447.46) 6582.54,4466.77 ccw(c6582.54,4486.09) U17.28@6596.19,4472.43 ; U16.28@7294.41,4466.77 7337.19,4466.77 7345.19,4458.77 ; U16.28@7317.63,4461.12 cw(c7331.28,4447.46) 7331.28,4466.77 cw(c7331.28,4486.09) U16.28@7317.63,4472.43 ; v1@7340.19,4449.78 ccw(c7334.62,4458.77) 7345.19,4458.77 ; v1(7345.19,4441.71) 7345.19,4458.77 ; v1@7350.19,4449.78 cw(c7355.76,4458.77) 7345.19,4458.77
  Top Layer w8: U7.D5@7869.69,4459.32 cw(c7869.69,4444.83) 7879.93,4455.07 cw(c7890.17,4465.32) U7.D5@7875.69,4465.32 ; U7.D5@7869.69,4465.32 v2(7889.37,4445.63) ; v2@7880.37,4445.63 ccw(c7858.64,4445.63) 7874.01,4460.99 ccw(c7889.37,4476.36) v2@7889.37,4454.63
  MidLayer2 w4: v1(6090.19,4366.71) 6123.52,4366.71 6148.52,4391.71 6260.19,4391.71 6273.52,4378.37 6468.65,4378.37 6548.65,4458.37 v1(6572.86,4458.37) 6636.67,4458.37 6645,4450.04 6748.52,4450.04 6781.86,4416.71 6823.52,4416.71 6840.19,4400.04 7015.19,4400.04 7023.52,4391.71 7048.52,4391.71 7065.19,4408.37 7311.86,4408.37 v1(7345.19,4441.71) ; v1@6094.08,4362.82 cw(c6103.47,4353.43) 6103.47,4366.71 cw(c6103.47,4379.99) v1@6094.08,4370.6 ; v1@6096.91,4359.99 cw(c6113.13,4343.77) 6113.13,4366.71 cw(c6113.13,4389.64) v1@6096.91,4373.43 ; v1@6566.14,4451.66 ccw(c6549.92,4435.44) 6549.92,4458.37 ccw(c6549.92,4481.31) v1@6566.14,4465.09 ; v1@6568.97,4454.49 ccw(c6559.58,4445.1) 6559.58,4458.37 ccw(c6559.58,4471.65) v1@6568.97,4462.26 ; v1@6576.75,4454.49 cw(c6586.14,4445.1) 6586.14,4458.37 cw(c6586.14,4471.65) v1@6576.75,4462.26 ; v1@6579.57,4451.66 cw(c6595.79,4435.44) 6595.79,4458.37 cw(c6595.79,4481.31) v1@6579.57,4465.09 ; v1@7335.69,4441.71 cw(c7312.76,4441.71) 7328.97,4425.49 cw(c7345.19,4409.27) v1@7345.19,4432.21 ; v1@7339.69,4441.71 cw(c7326.41,4441.71) 7335.8,4432.32 cw(c7345.19,4422.93) v1@7345.19,4436.21
  Bottom Layer w4: v1@7345.19,4432.21 cw(c7345.19,4409.27) 7361.41,4425.49 cw(c7377.63,4441.71) v1@7354.69,4441.71 ; v1@7345.19,4436.21 cw(c7345.19,4422.93) 7354.58,4432.32 cw(c7363.97,4441.71) v1@7350.69,4441.71 ; v1(7345.19,4441.71) 7365.19,4421.71 7365.19,4383.37 7407.19,4341.37 7440.19,4341.37 7556.86,4458.04 7556.86,4566.71 7540.19,4583.37 7540.19,4691.71 7565.19,4716.71 7606.86,4716.71 7656.86,4666.71 7656.86,4569.04 7681.86,4544.04 7848.52,4544.04 7868.52,4524.04 7868.52,4466.48 v2(7889.37,4445.63) ; v2@7878.37,4445.63 ccw(c7851.81,4445.63) 7870.59,4464.41 ccw(c7889.37,4483.19) v2@7889.37,4456.63 ; v2@7882.37,4445.63 ccw(c7865.47,4445.63) 7877.42,4457.58 ccw(c7889.37,4469.53) v2@7889.37,4452.63
DB_MEM.BUS_A21: U7.D4 U8.J22 | length 2792
  Top Layer w4: U8.J22@5724.65,4367.17 v3(5744.33,4386.85) ; U8.J22@5724.65,4374.51 ccw(c5724.65,4392.23) 5737.18,4379.7 ccw(c5749.71,4367.17) U8.J22@5731.99,4367.17 ; U8.J22@5724.65,4374.67 ccw(c5724.65,4392.77) 5737.45,4379.97 ccw(c5750.25,4367.17) U8.J22@5732.15,4367.17 ; 5731.53,4374.05 cw(c5744.33,4361.24) 5744.33,4379.35 ccw(c5744.33,4361.24) 5731.53,4374.05 ; 5731.53,4374.05 ccw(c5718.72,4386.85) 5736.83,4386.85 cw(c5718.72,4386.85) 5731.53,4374.05
  Top Layer w8: U7.D4@7869.69,4504.69 v2(7889.37,4524.37) ; U7.D4@7869.69,4510.69 ccw(c7869.69,4525.17) 7879.93,4514.93 ccw(c7890.17,4504.69) U7.D4@7875.69,4504.69 ; v2@7880.37,4524.37 cw(c7858.64,4524.37) 7874.01,4509.01 cw(c7889.37,4493.64) v2@7889.37,4515.37
  MidLayer1 w4: v3@5744.98,4394.32 ccw(c5746.56,4412.36) 5758.2,4398.49 ccw(c5769.84,4384.62) v3@5751.8,4386.2 ; 5757.91,4398.24 cw(c5767.84,4388.31) 5767.84,4402.36 5861.38,4402.36 5910,4402.36 5920,4402.36 5966.98,4402.36 5970,4405.37 6021.86,4405.37 6043.86,4427.37 6043.86,4458.37 6060.52,4475.04 6081.86,4475.04 6206.86,4600.04 6314.19,4600.04 6331.86,4617.71 6530.86,4617.71 6590.19,4558.37 6706.86,4558.37 6740.19,4591.71 6923.52,4591.71 6931.86,4600.04 6931.86,4641.71 v1(6921.19,4652.37)
  MidLayer2 w4: v1(6921.19,4652.37) 6916.86,4648.04 6916.86,4644.71 6923.52,4638.04 7194.35,4638.04 7265.69,4709.37 7581.86,4709.37 7616.19,4675.04 7774.86,4675.04 7791.52,4658.37 7791.52,4546.04 7793.52,4544.04 7869.86,4544.04 7873.52,4540.37 7873.52,4540.22 v2(7889.37,4524.37)
DB_MEM.BUS_A22: U7.C5 U8.L22 | length 2823.5
  Top Layer w4: U8.L22@5724.65,4288.43 v3(5744.33,4308.11) ; U8.L22@5724.65,4295.77 ccw(c5724.65,4313.49) 5737.18,4300.96 ccw(c5749.71,4288.43) U8.L22@5731.99,4288.43 ; U8.L22@5724.65,4295.93 ccw(c5724.65,4314.03) 5737.45,4301.23 ccw(c5750.25,4288.43) U8.L22@5732.15,4288.43 ; 5731.53,4295.31 cw(c5744.33,4282.5) 5744.33,4300.61 ccw(c5744.33,4282.5) 5731.53,4295.31 ; 5731.53,4295.31 ccw(c5718.72,4308.11) 5736.83,4308.11 cw(c5718.72,4308.11) 5731.53,4295.31
  Top Layer w8: U7.C5@7909.06,4459.32 cw(c7909.06,4444.83) 7919.3,4455.07 cw(c7929.54,4465.32) U7.C5@7915.06,4465.32 ; U7.C5@7909.06,4465.32 v2(7928.74,4445.63) ; v2@7919.74,4445.63 ccw(c7898.01,4445.63) 7913.38,4460.99 ccw(c7928.74,4476.36) v2@7928.74,4454.63
  MidLayer1 w4: v3@5744.98,4315.58 ccw(c5746.56,4333.62) 5758.2,4319.75 ccw(c5769.84,4305.88) v3@5751.8,4307.46 ; 5757.91,4319.5 cw(c5767.84,4309.57) 5767.84,4323.62 5861.38,4323.62 5910,4323.62 5920,4323.62 5988.77,4323.62 5998.52,4333.37 6140.19,4333.37 6214.19,4407.37 6268.5,4407.37 6276.84,4399.04 6404.86,4399.04 v1(6406.86,4397.04) ; 6379.09,4399.04 cw(c6379.09,4369.28) v1@6400.14,4390.32 ; v1@6400.14,4403.76 cw(c6388.75,4415.15) 6388.75,4399.04 cw(c6388.75,4378.93) v1@6402.97,4393.15
  MidLayer2 w4: v1(6406.86,4397.04) 6476,4397.04 6555,4476.04 6630.86,4476.04 6648.52,4458.37 6831.86,4458.37 6865.19,4425.04 6965.19,4425.04 6981.86,4441.71 6981.86,4519.08 6988.15,4525.37 7149.88,4525.37 7208.54,4466.71 7272.17,4466.71 7281.5,4476.04 7898.33,4476.04 v2(7928.74,4445.63) ; v1@6410.75,4393.15 cw(c6420.14,4383.76) 6420.14,4397.04 cw(c6420.14,4410.32) v1@6410.75,4400.93 ; v1@6413.57,4390.32 cw(c6429.79,4374.11) 6429.79,4397.04 cw(c6429.79,4419.98) v1@6413.57,4403.76 ; v2@7917.74,4445.63 ccw(c7891.18,4445.63) 7909.96,4464.41 ccw(c7928.74,4483.19) v2@7928.74,4456.63 ; v2@7921.74,4445.63 ccw(c7904.84,4445.63) 7916.79,4457.58 ccw(c7928.74,4469.53) v2@7928.74,4452.63
DB_MEM.BUS_A23: U7.B8 U8.N24 | length 2749.3
  Top Layer w4: U8.N24@5803.39,4217.03 ccw(c5803.39,4234.75) 5815.92,4222.22 ; U8.N24@5810.73,4209.69 cw(c5828.45,4209.69) 5815.92,4222.22 ; v1@5943.68,4216.55 ccw(c5938.66,4225.04) 5948.52,4225.04 ; v1(5948.52,4208.37) 5948.52,4225.04 ; v1@5953.36,4216.55 cw(c5958.39,4225.04) 5948.52,4225.04 ; 5815.92,4222.22 cw(c5843.27,4194.87) 5843.27,4233.55 5910,4233.55 5920,4233.55 5924.74,4233.55 5940.02,4233.55 5948.52,4225.04
  Top Layer w8: U7.B8@7948.43,4341.2 cw(c7948.43,4326.72) 7958.67,4336.96 cw(c7968.91,4347.2) U7.B8@7954.43,4347.2 ; U7.B8@7948.43,4347.2 v2(7968.11,4327.52) ; v2@7959.11,4327.52 ccw(c7937.38,4327.52) 7952.75,4342.88 ccw(c7968.11,4358.25) v2@7968.11,4336.52
  MidLayer2 w4: v1@5952.41,4204.49 cw(c5961.8,4195.1) 5961.8,4208.37 cw(c5961.8,4221.65) v1@5952.41,4212.26 ; v1@5955.24,4201.66 cw(c5971.46,4185.44) 5971.46,4208.37 cw(c5971.46,4231.31) v1@5955.24,4215.09 ; 6004.19,4216.71 6012.52,4225.04 ; 7946.22,4344.01 ccw(c7961.25,4359.04) v2@7965.77,4338.27 ; 7951.4,4338.83 ccw(c7963.1,4350.53) v2@7966.62,4334.36 ; 7953.15,4337.08 cw(c7943.59,4327.52) v2@7957.11,4327.52 ; 7956.58,4333.65 ccw(c7964.96,4342.02) v2@7967.47,4330.45 ; v2(7968.11,4327.52) 7962.26,4333.37 7956.86,4333.37 7943.52,4346.71 7873.52,4346.71 7815.19,4288.37 7815.19,4225.04 7731.86,4141.71 7525,4141.71 7470.54,4141.71 7436.88,4108.04 7315.52,4108.04 7306.86,4116.71 7273.52,4150.04 7206.86,4150.04 7181.86,4125.04 7023.52,4125.04 7015.19,4133.37 6848.52,4133.37 6823.52,4158.37 6698.52,4158.37 6680.52,4176.37 6630.52,4176.37 6603.15,4176.37 6588.15,4191.37 6482.19,4191.37 6440.19,4233.37 6323.52,4233.37 6303.19,4213.04 6248.52,4213.04 6218.86,4183.37 6168.86,4183.37 6110.52,4241.71 6062.21,4241.71 6053.88,4250.04 6020.86,4250.04 6012.52,4241.71 6012.52,4225.04 ; v1@5956.86,4208.37 5952.69,4204.21 5948.52,4200.04 v1(5948.52,4208.37) v1@5956.86,4208.37 ; v1@5956.86,4208.37 5995.86,4208.37 6012.52,4225.04